# Altium PCB BMS_PCB.PcbDoc (part 1 of 2)
Units mm, origin at the board's own origin, x right, y up, seen from the top; angles counter-clockwise.
Board outline 90.35 x 67.67 mm, 4 copper layers (Top Layer, GND, Layer 3, Bottom Layer), stack 1.579 mm thick; 81 components, 51 nets, 216 pads, 284 vias.
Unrouted connection lines stored in the file: 45.
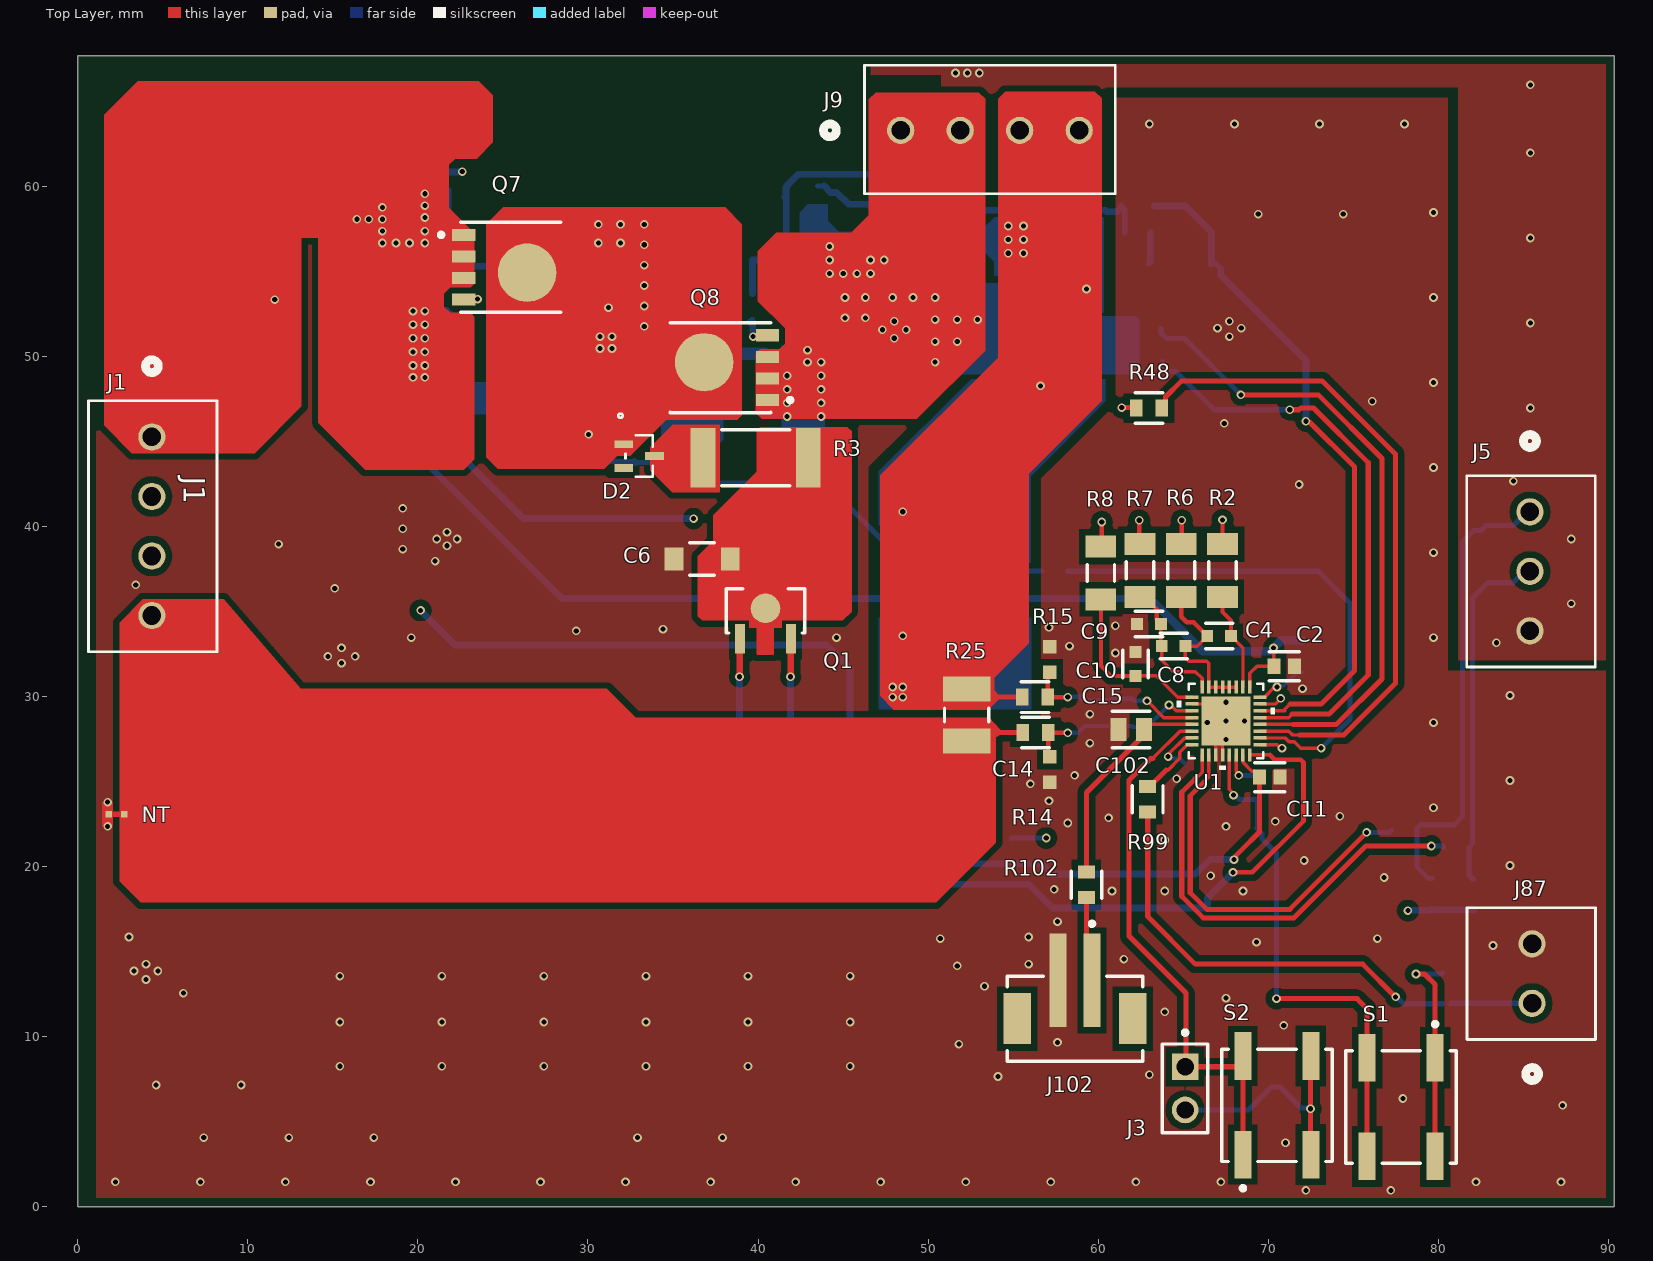
[diagram p0: Top Layer view]
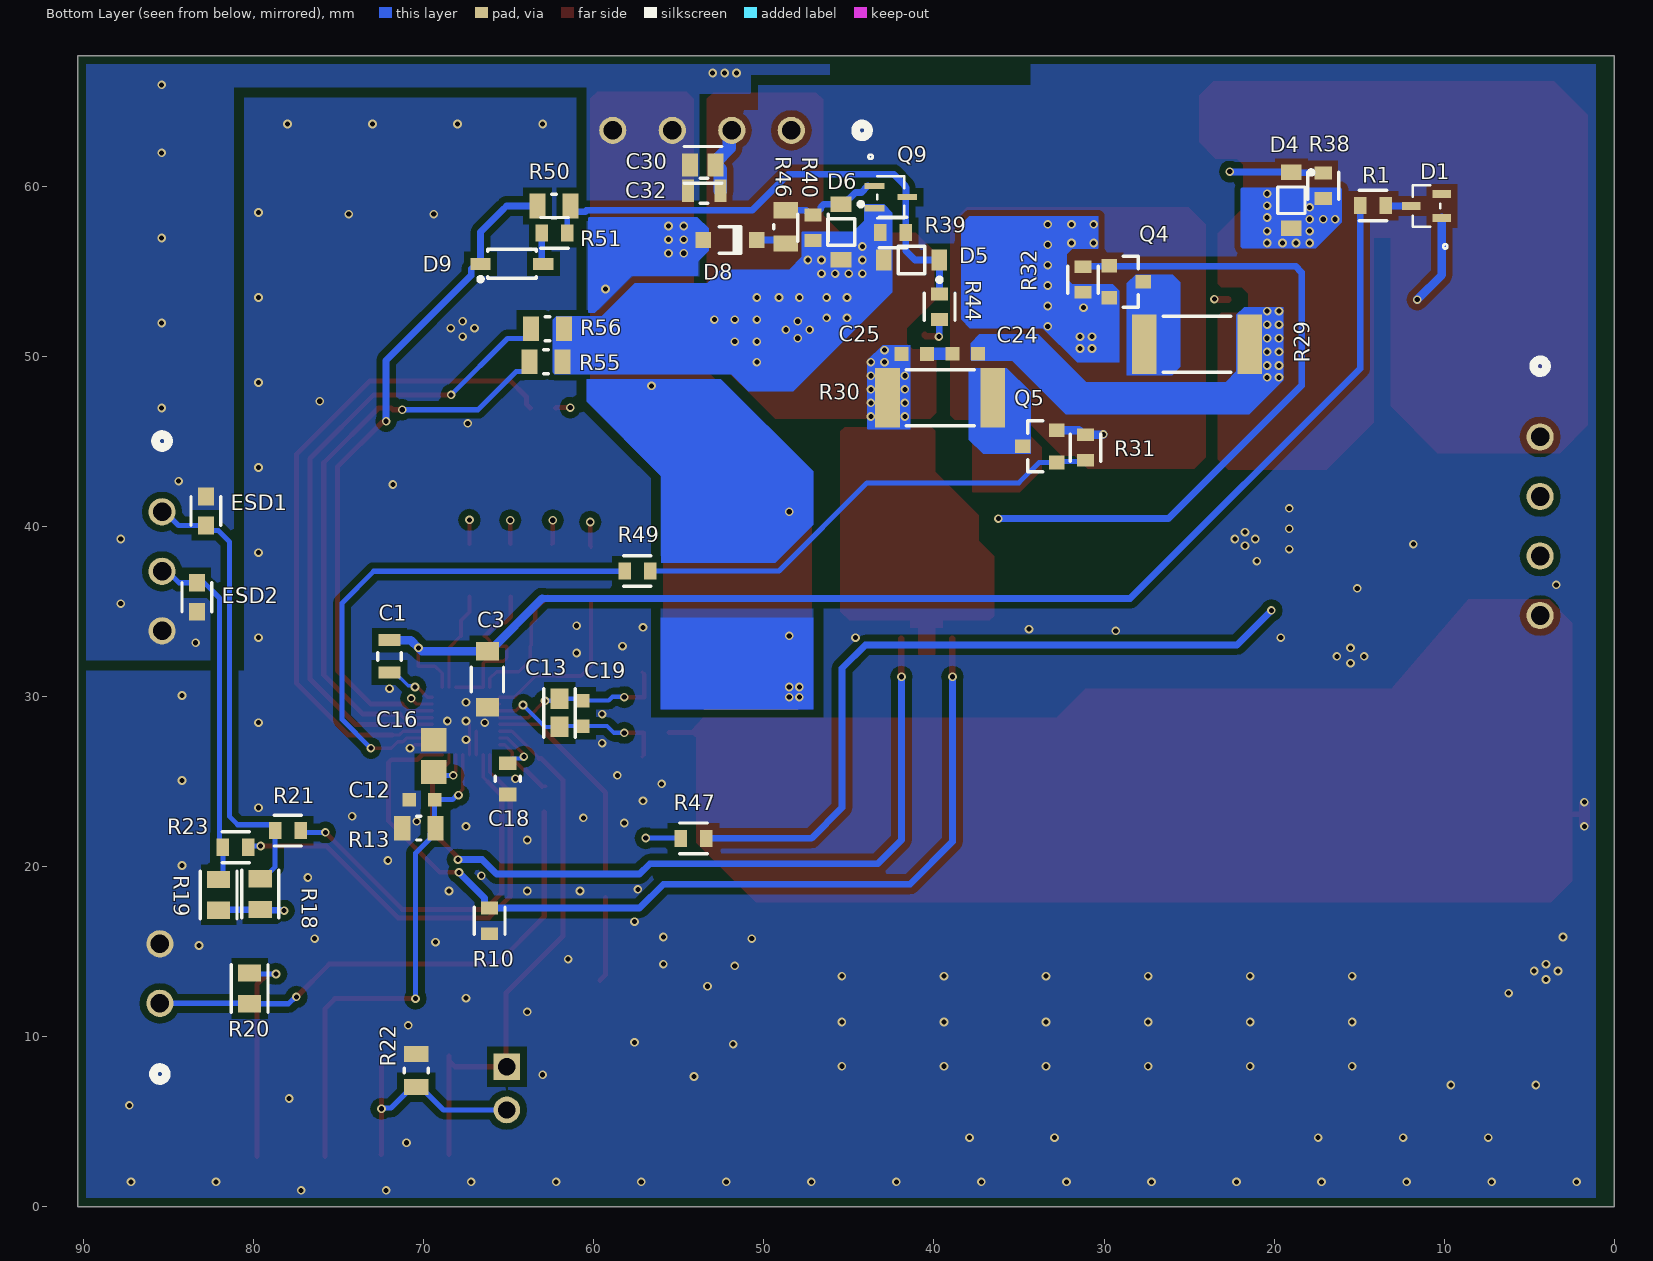
[diagram p1: Bottom Layer view, seen from below]
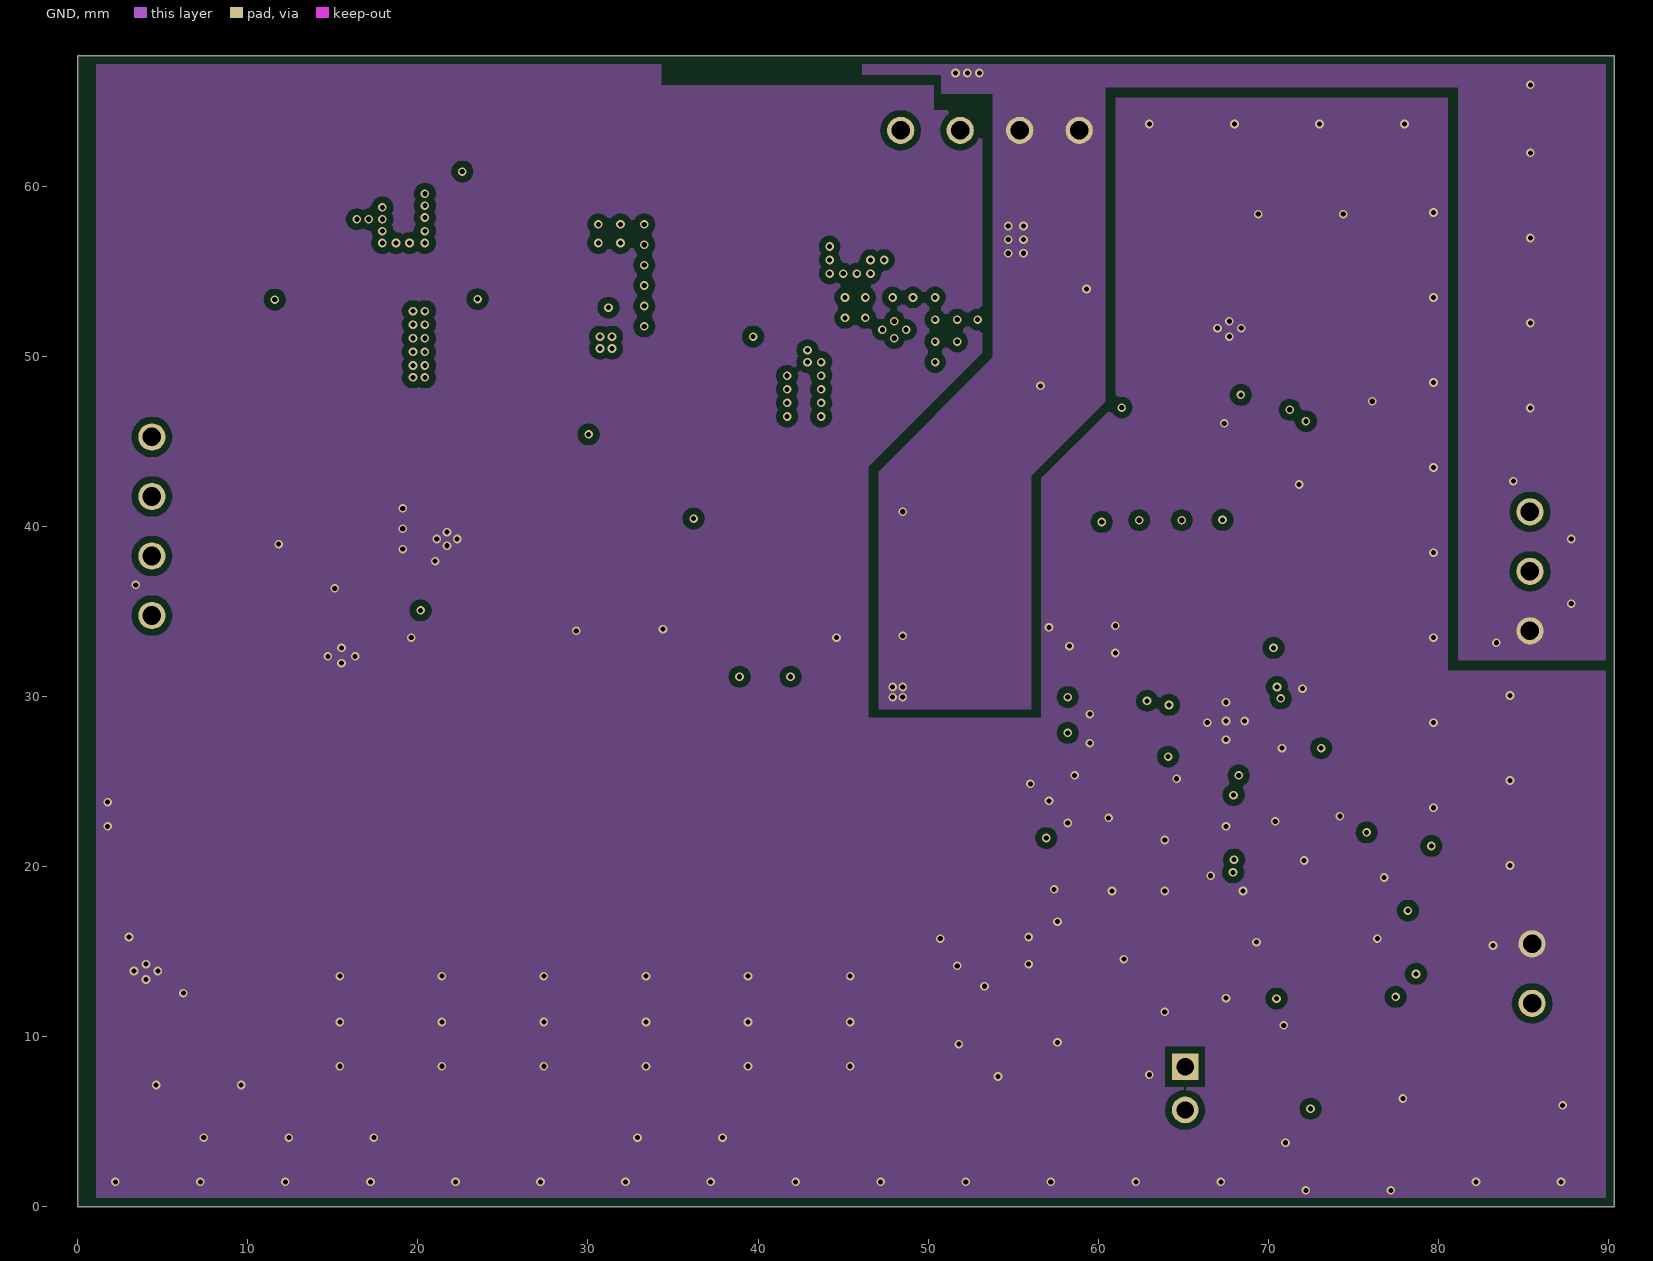
[diagram p2: GND]
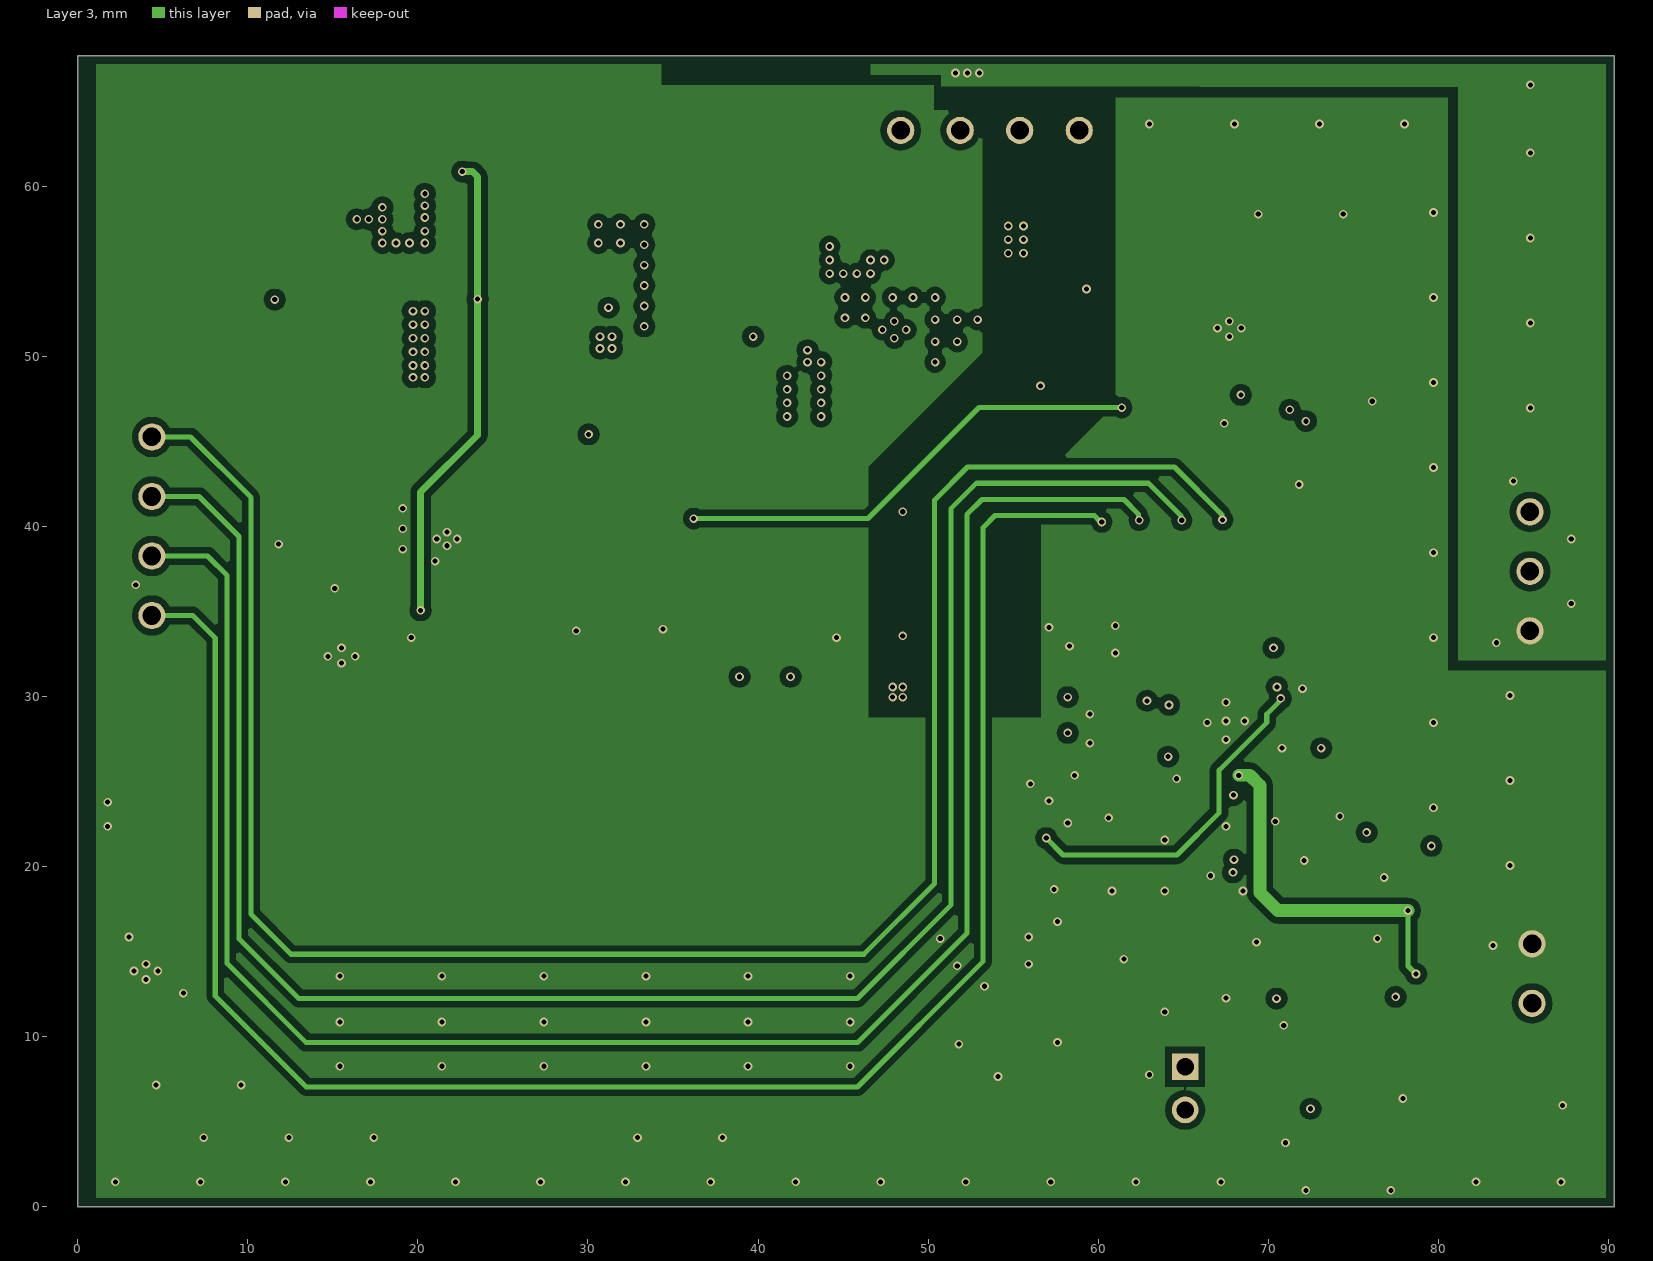
[diagram p3: Layer 3]
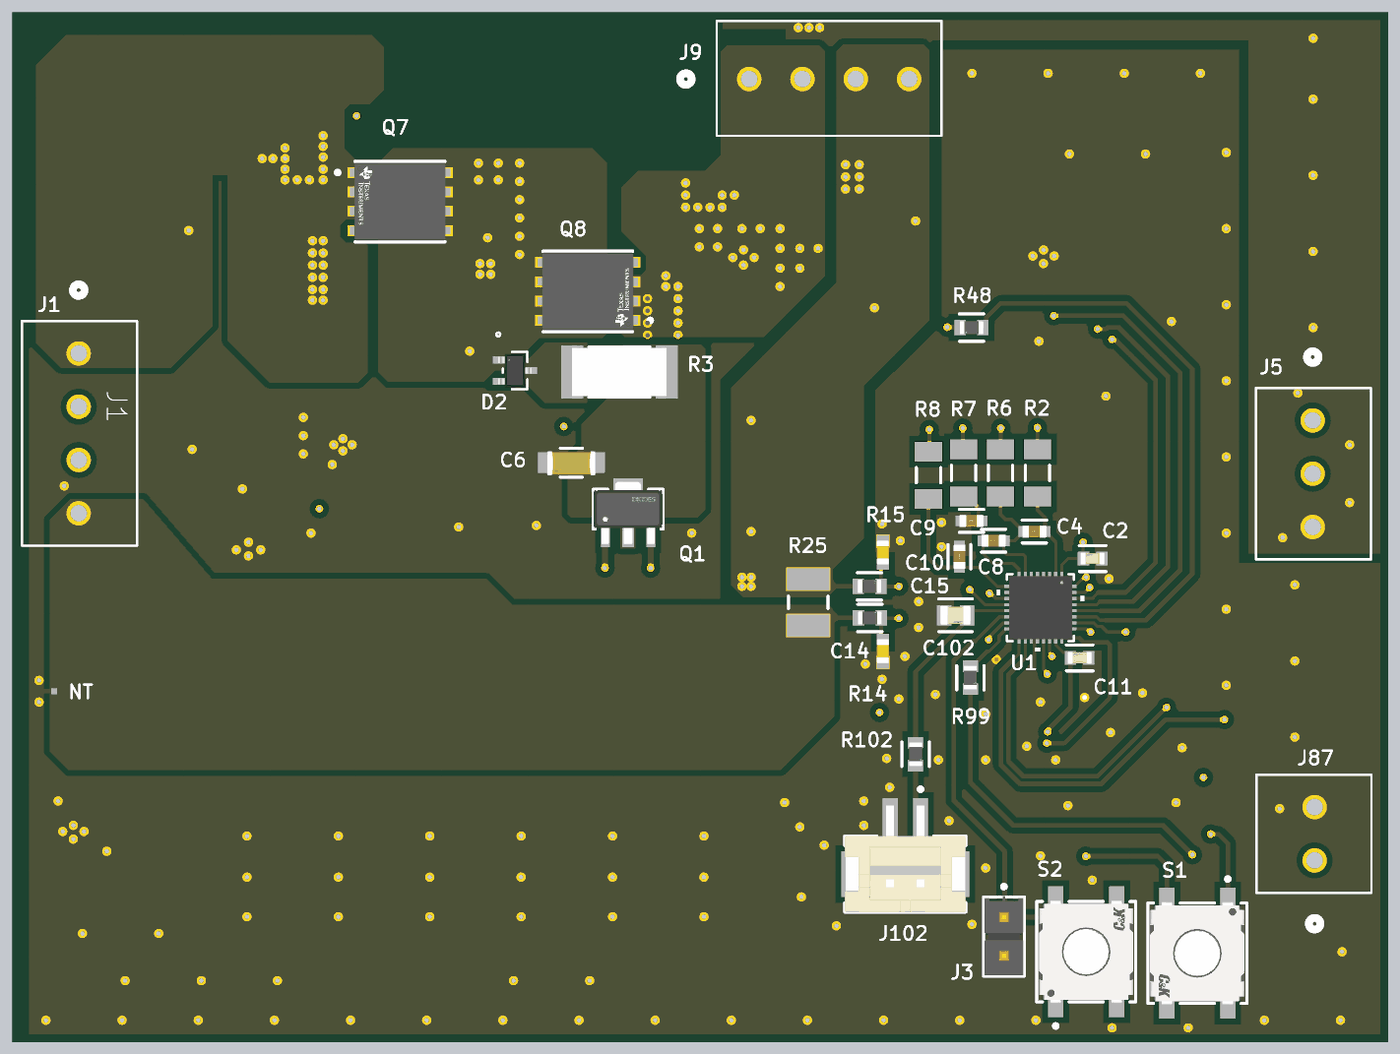
[diagram p5: 3D render of the assembled board from above, using the file's embedded part models]
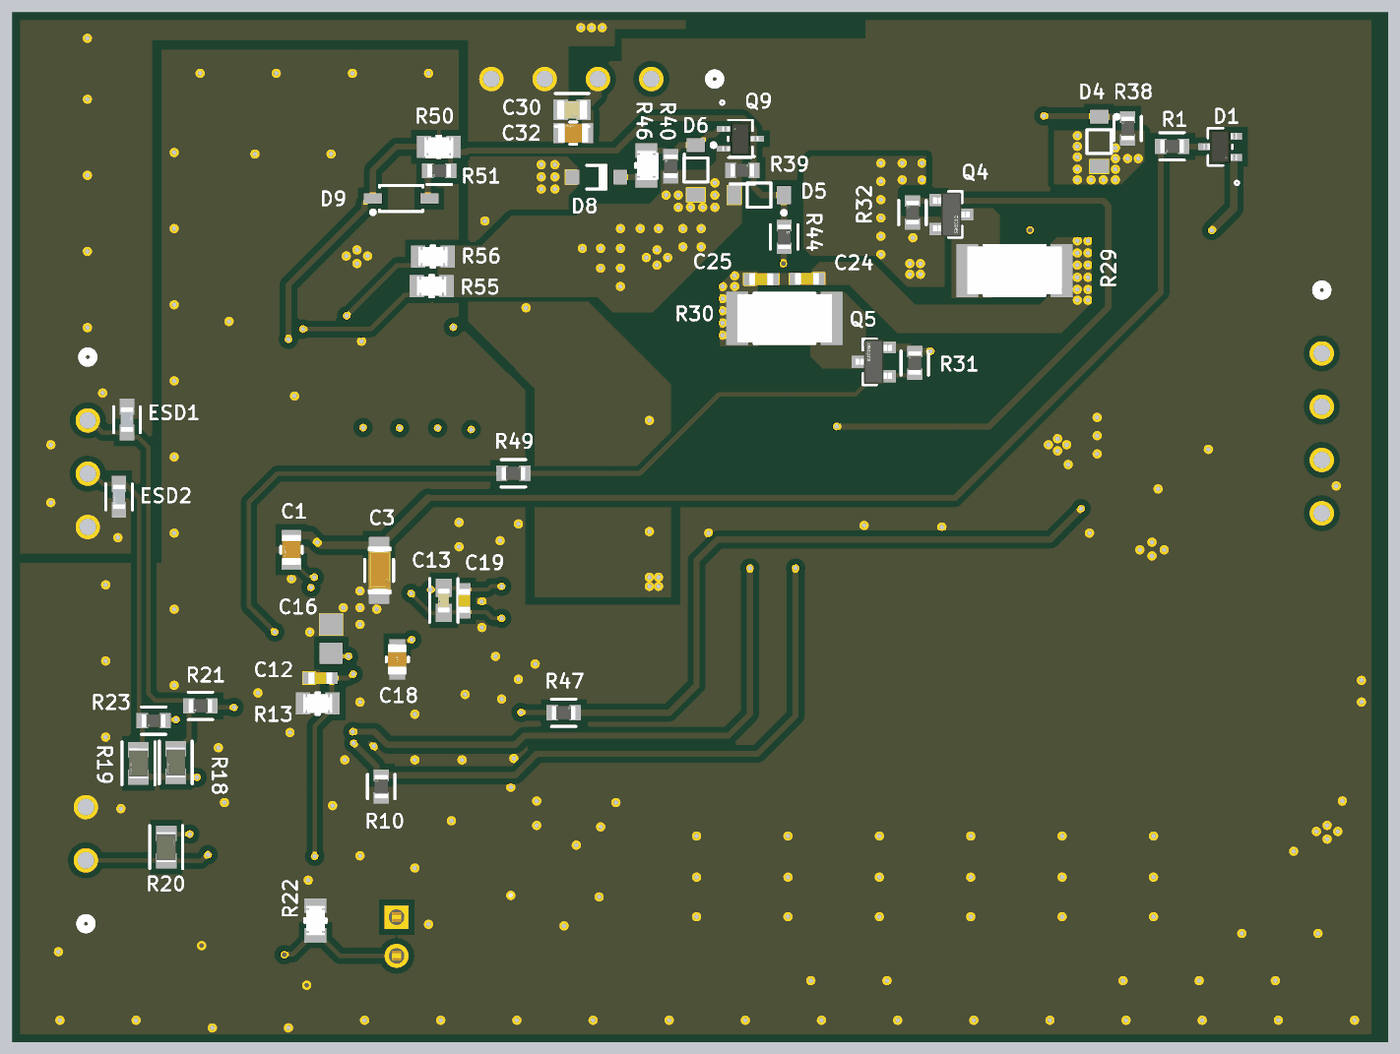
[diagram p6: 3D render of the assembled board from below, using the file's embedded part models]

## Layer stack, top to bottom
Top Solder: solder mask 0.0102, Solder Resist, Dk 3.5
Top Layer: signal copper 0.0356
Dielectric 1: prepreg 0.1524, FR-4 High Tg, Dk 4.2
GND: signal copper 0.0175
Dielectric 2: core 1.1684, FR-4 High Tg, Dk 4.2
Layer 3: signal copper 0.0175
Dielectric 3: prepreg 0.1524, FR-4 High Tg, Dk 4.2
Bottom Layer: signal copper 0.0356
Bottom Solder: solder mask 0.0102, Solder Resist, Dk 3.5

## Board outline
0,0 90.348,0 90.348,67.666 0,67.666

## Design rules (kind name [scope] priority, off if disabled: settings)
AcuteAngle [All] p1: minimum=4.50000000000000E+0001 checktracksonly=FALSE
AssemblyTestPointUsage [All] p1: valid=2
BoardOutlineClearance BoardOutlineClearance_MountingHoles [OnCopper and InComponentClass('Mounting Holes')] p1: gap=1 ignorepadtopadclearanceinfootprint=FALSE
BoardOutlineClearance BoardOutlineClearance_Poly [OnCopper and IsPoly] p2: gap=0.508 ignorepadtopadclearanceinfootprint=FALSE
BoardOutlineClearance [OnCopper and Not InComponentClass('Logo') and not InComponentClass('FiducialMark') and not InRegion(1000,500,4000,800) and not InPoly] p3: gap=0.457 ignorepadtopadclearanceinfootprint=FALSE
Clearance Clearance_U1_Room [(IsTrack Or IsVia) vs IsPad And InComponent('U1')] p1: gap=0.15 ignorepadtopadclearanceinfootprint=FALSE
Clearance Clearance_U1_Internal [IsPad And InComponent('U1') vs IsPad And InComponent('U1')] p2: gap=0.2 ignorepadtopadclearanceinfootprint=TRUE except(0: Arc-Hole Track-Hole SMDPad-Hole THPad-Hole Via-Hole Fill-Hole Poly-Hole Region-Hole Text-Hole)
Clearance Clearance_Keepouts [((IsTrack Or IsArc) And Not InPoly) And IsFree and IsKeepOut vs ((IsTrack Or IsArc) And Not InPoly) And IsFree and IsKeepOut] p3: gap=0 ignorepadtopadclearanceinfootprint=FALSE
Clearance Clearance_Poly [InPolygon] p4: gap=0.381 ignorepadtopadclearanceinfootprint=FALSE except(0: Arc-Hole Track-Hole SMDPad-Hole THPad-Hole Via-Hole Fill-Hole Poly-Hole Region-Hole Text-Hole)
Clearance Clearance_FiducialMark [IsKeepOut and InComponentClass('FiducialMark') vs IsPad and InComponentClass('FiducialMark')] p5: gap=0 ignorepadtopadclearanceinfootprint=FALSE
Clearance [All] p6: gap=0.2 ignorepadtopadclearanceinfootprint=FALSE except(0: Arc-Hole Track-Hole SMDPad-Hole THPad-Hole Via-Hole Fill-Hole Poly-Hole Region-Hole Text-Hole)
ComponentClearance Conn_BodyCollision_Off [InComponent('J9') OR InComponent('J5') OR InComponent('J87') OR InComponent('J1') vs IsComponent] p1: gap=0 collisioncheckmode=3 verticalgap=0 showdistances=FALSE
ComponentClearance "ComponentClearance_TP / Logo" [HasFootprint('IEC_HotSurface_Medium')] p2: gap=0 collisioncheckmode=3 verticalgap=0 showdistances=FALSE // IEC_HotSurface_Medium
ComponentClearance ComponentClearance_Net-tie [HasFootprint('Net-Tie_10mil') or HasFootprint('Net-Tie_50milWide_30milLong') or HasFootprint('Net-Tie_0805_HV_NoOverlay')] p3: gap=0 collisioncheckmode=3 verticalgap=0 showdistances=FALSE
ComponentClearance ComponentClearance_MountingHoles_FiducialMarks [InComponentClass('Mounting Holes') vs InComponentClass('FiducialMark')] p4: gap=0.254 collisioncheckmode=3 verticalgap=0.254 showdistances=FALSE
ComponentClearance ComponentClearance_Shunt [HasFootprint('SNT-100-BK-G')] p5: gap=0 collisioncheckmode=3 verticalgap=0 showdistances=TRUE
ComponentClearance ComponentClearance_Logo [InComponentClass('Logo')] p6: gap=0 collisioncheckmode=3 verticalgap=0 showdistances=FALSE
ComponentClearance ComponentClearance_ScrewToNut [(HasFootprint('NY PMS 440 0025 PH')) vs (HasFootprint('Keystone_1902C'))] p7: gap=0.127 collisioncheckmode=3 verticalgap=0.254 showdistances=FALSE
ComponentClearance ComponentClearance_MountingHoles [InComponentClass('Mounting Holes')] p8: gap=6.35 collisioncheckmode=3 verticalgap=2540 showdistances=FALSE
ComponentClearance ComponentClearance_SmallPassives [HasFootprint('0201*') or HasFootprint('0402*') or HasFootprint('0508') or HasFootprint('0603*') or HasFootprint('0612') or HasFootprint('0805*') or HasFootprint('0815*') or HasFootprint('0830*') or HasFootprint('1206*') or HasFootprint('1210*') or HasFootprint('1808*') or HasFootprint('1812*') or HasFootprint('1825*') or HasFootprint('2010*') or HasFootprint('2220*') or HasFootprint('2225*') or HasFootprint('2512*') or HasFootprint('2728*') or HasFootprint('3518*') vs HasFootprint('0201*') or HasFootprint('0402*') or HasFootprint('0508') or HasFootprint('0603*') or HasFootprint('0612') or HasFootprint('0805*') or HasFootprint('0815*') or HasFootprint('0830*') or HasFootprint('1206*') or HasFootprint('1210*') or HasFootprint('1808*') or HasFootprint('1812*') or HasFootprint('1825*') or HasFootprint('2010*') or HasFootprint('2220*') or HasFootprint('2225*') or HasFootprint('2512*') or HasFootprint('2728*') or HasFootprint('3518*')] p9: gap=0.254 collisioncheckmode=3 verticalgap=0.254 showdistances=FALSE
ComponentClearance ComponentClearance_THtoSMT [IsThruComponent vs IsSMTComponent] p10: gap=0.254 collisioncheckmode=3 verticalgap=0.762 showdistances=FALSE
ComponentClearance ComponentClearance_THtoTH [IsThruComponent vs IsThruComponent] p11: gap=0.254 collisioncheckmode=3 verticalgap=0.762 showdistances=FALSE
ComponentClearance [All] p12: gap=0.254 collisioncheckmode=3 verticalgap=0.254 showdistances=FALSE
DiffPairsRouting [All] p1: maxlimit=2.54 minlimit=0.254 mostfreqgap=0.254 toplayer_minwidth=0.381 toplayer_maxwidth=0.381 toplayer_prefwidth=0.381 midlayer1_minwidth=0.381 midlayer1_maxwidth=0.381 midlayer1_prefwidth=0.381 midlayer2_minwidth=0.381 midlayer2_maxwidth=0.381 midlayer2_prefwidth=0.381 bottomlayer_minwidth=0.381 bottomlayer_maxwidth=0.381 bottomlayer_prefwidth=0.381 maxuncoupledlength=25.4
FabricationTestPointUsage TestPointUsage [All] p1: valid=2 allowmultiple=FALSE
FabricationTestpoint Testpoint [All] p1: side=3 testpointundercomponent=TRUE minsize=1.016 maxsize=2.54 preferedsize=1.524 minholesize=0 maxholesize=1.016 preferedholesize=0.813 testpointgrid=0.025 allowsidetop=TRUE allowsidebottom=TRUE usegrid=TRUE gridtolerance=0
FanoutControl Fanout_LCC [IsLCC] p1: bgadir=Out bgaviamode=Centered fanoutstyle=Auto fanoutdirection=Alternating viagrid=0.025 // Fanout_LCC (Default Rule)
FanoutControl Fanout_BGA [IsBGA] p2: bgadir=Out bgaviamode=Centered fanoutstyle=Auto fanoutdirection=Alternating viagrid=0.025 // Fanout_BGA (Default Rule)
FanoutControl Fanout_Default [All] p4: bgadir=Out bgaviamode=Centered fanoutstyle=Auto fanoutdirection=Alternating viagrid=0.025 // Fanout_Default (Default Rule)
FanoutControl Fanout_Small [(CompPinCount < 5)] p5: bgadir=Out bgaviamode=Centered fanoutstyle=Auto fanoutdirection=OutThenIn viagrid=0.025 // Fanout_Small (Default Rule)
HoleSize [All] p1: absolutevalues=TRUE maxlimit=6.375 minlimit=0.2 maxpercent=80.000 minpercent=20.000
MinimumAnnularRing MinimumAnnularRing_ThermalPadVias [IsVia and InAnyComponent] p1: minimumring=0.15
MinimumAnnularRing [All] p2: minimumring=0.127
MinimumSolderMaskSliver MinimumSolderMaskSliver_Logo [InComponentClass('Logo') vs InComponentClass('Logo')] p1: minsoldermaskwidth=0.018
MinimumSolderMaskSliver [All] p2: minsoldermaskwidth=0.099
PlaneConnect [All] p1: planeconnectstyle=Relief reliefexpansion=0.254 reliefentries=4 reliefconductorwidth=0.254 reliefairgap=0.254
PolygonConnect [All] p1: connectstyle=Direct reliefconductorwidth=0.254 reliefentries=4 polygonreliefangle="90 Angle" airgapwidth=0.254
RoutingVias ThermalPadVias [IsVia and InAnyComponent] p1: holewidth=0.2 width=0.5 viastyle="Through Hole" minholewidth=0.2 minwidth=0.5 maxholewidth=0.33 maxwidth=0.6
RoutingVias [All] p2: holewidth=0.406 width=0.864 viastyle="Through Hole" minholewidth=0.2 minwidth=0.508 maxholewidth=1.016 maxwidth=1.651
SilkToSilkClearance SilkToSilkClearance_Pb-FreeLogo [(HasFootprint('Pb-Free_Overlay_Medium') OR HasFootprint('Pb-Free_Overlay_Small')) vs (HasFootprint('Pb-Free_Overlay_Medium') OR HasFootprint('Pb-Free_Overlay_Small'))] p1: silktosilkclearance=0
SilkToSilkClearance [All] p2: silktosilkclearance=0.099
SilkToSolderMaskClearance SilkToComponentPadClearance [(IsPad or IsFill or IsRegion) and InAnycomponent] p1: minsilkscreentomaskgap=0.127 clearancetoexposedcopper=TRUE
SilkToSolderMaskClearance "Silk to Solder Mask Opening" [All] p2: minsilkscreentomaskgap=0.1 clearancetoexposedcopper=FALSE
SolderMaskExpansion [All] p1: expansion=0.05 istentingtop=FALSE
SupplyNets "Schematic Supply Nets" [InNet('VSS')] p1: voltage=0.000
SupplyNets "Schematic Supply Nets_3" [InNet('REG1')] p2: voltage=0.000
SupplyNets "Schematic Supply Nets_1" [InNet('PGND')] p3: voltage=0.000
Width [All] p1: maxlimit=2.54 minlimit=0.152 preferedwidth=0.254 checkconnectedcopper=TRUE
16 further rules are at their usual default settings.

## Components (designator, comment, footprint, x,y, rotation, side; value= is the part's Value field where it differs from the comment)
C1 "GCM219R71E474KA55D" FP-GCM219-0_15-MFG 72.013,32.35 r270 bottom locked value=470nF
C2 "C0603C101J5GACTU" FP-C0603C-CF-MFG 70.938,31.775 r0 top locked value=100pF
C3 "CGA5L3X7R1H105K160AB" FP-CGA5L-0_3-0_1-MFG 66.263,31 r270 bottom locked value=1µF
C4 "C1608X7R1H224K080AB" FP-C1608-080-0_1-MFG 67.113,33.55 r0 top locked value=220nF
C6 "CGA5L3X7R1H105K160AB" FP-CGA5L-0_3-0_1-MFG 36.713,38.075 r180 top locked value=1µF
C8 "C1608X7R1H224K080AB" FP-C1608-080-0_1-MFG 64.438,32.95 r0 top locked value=220nF
C9 "C1608X7R1H224K080AB" FP-C1608-080-0_1-MFG 62.988,34.25 r0 top locked value=220nF
C10 "C1608X7R1H224K080AB" FP-C1608-080-0_1-MFG 62.188,31.9 r270 top locked value=220nF
C11 "C0603C223K4RACTU" FP-C0603C-CF-MFG 70.088,25.25 r0 top locked value=22nF
C12 "885012206040" WCAP-CSGP_0603_L1.6W0.8H0.8_Reflow 70.113,23.925 r0 bottom locked value=10nF
C13 "C0603C101J5GACTU" FP-C0603C-CF-IPC_A 62.013,29.025 r90 bottom locked value=100pF
C14 "885012206095" WCAP-CSGP_0603_L1.6W0.8H0.8_Reflow 57.163,25.7 r270 top locked value=100nF
C15 "885012206095" WCAP-CSGP_0603_L1.6W0.8H0.8_Reflow 57.163,32.175 r90 top locked value=100nF
C16 "GRM21BR71C105KA01L" CAPC2013X135X45ML10T25 69.413,26.5 r90 bottom locked value=1µF
C18 "C2012X7R1C225K125AB" FP-C2012-125-0_2-MFG 65.063,25.15 r270 bottom locked value=2.2µF
C19 "885012206095" WCAP-CSGP_0603_L1.6W0.8H0.8_Reflow 60.663,29 r90 bottom locked value=100nF
C24 "885012206095" WCAP-CSGP_0603_L1.6W0.8H0.8_Reflow 38.163,50.15 r0 bottom locked value=100nF
C25 "885012206095" WCAP-CSGP_0603_L1.6W0.8H0.8_Reflow 41.163,50.125 r0 bottom locked value=100nF
C30 "C0805C104K5RACTU" FP-C0805C-DN-MFG 53.588,61.25 r0 bottom locked value=100nF
C32 "GRM21BZ71E475KE15L" FP-GRM21B-0_2-e0_2_0_7-MFG 53.513,59.725 r0 bottom locked value=4.7µF
C102 "C0805C222K5RACTU" FP-C0805C-DN-MFG 61.938,28.05 r180 top locked value=2.2nF
D1 "BAS40W-7-F" SOT-323_DIO 11.038,58.825 r90 bottom locked
D2 "BAS40W-7-F" SOT-323_DIO 33.013,44.125 r270 top locked
D4 "MMSZ5246B-7-F" ONSC-SOD-123-2-425-04_V 18.988,59.165 r270 bottom locked
D5 "MMSZ5246B-7-F" ONSC-SOD-123-2-425-04_V 41.313,55.65 r0 bottom locked
D6 "MMSZ5246B-7-F" ONSC-SOD-123-2-425-04_V 45.463,57.3 r270 bottom locked
D8 "1N4148W-7-F" DIOD-SOD123-2_V 51.988,56.825 r180 bottom locked
D9 "BAT46W-E3-18" DIOD-SOD-123-2_V 64.813,55.425 r0 bottom locked
ESD1 "0603ESDA2-TR2" FP-PESD0603-MFG 82.813,40.9 r270 bottom locked
ESD2 "0603ESDA2-TR2" FP-PESD0603-MFG 83.338,35.825 r90 bottom locked
J1 "1820589" CONN_1751264_PXC 4.363,45.25 r270 top locked
J3 "TSW-102-12-T-S" FP-TSW-102-12-T-S-MFG 65.113,6.95 r270 top locked
J5 "1984950" CONN_1751251_PXC 85.388,40.85 r270 top locked
J9 "1820589" CONN_1751264_PXC 48.388,63.275 r0 top locked
J87 "1985807" CONN_1751248_PXC 85.513,11.95 r90 top locked
J102 "B2B-PH-SM4-TB(LF)(SN)" FP-B2B-PH-SM4-TB_LF_SN-MFG 58.638,11.05 r180 top locked
NT "Net-Tie" Net-Tie-Footprint-1 2.286,23.063 r0 top locked net-tie
Q1 "BCX5616H6433XTMA1" FP-SOT89-MFG 40.438,35.025 r0 top locked
Q4 "ZXMP6A13FTA" FP-SOT23-MFG 28.688,54.375 r180 bottom locked
Q5 "ZXMP6A13FTA" FP-SOT23-MFG 33.788,44.7 r0 bottom locked
Q7 "CSD18532Q5B" FP-DNK0008A-MFG 25.463,55.225 r0 top locked
Q8 "CSD18532Q5B" FP-DNK0008A-MFG 37.788,49.325 r180 top locked
Q9 "2N7002KW" SC-70_419AB-01_OSI 42.538,59.35 r270 bottom locked
R1 "CRCW0603100RJNEA" FP-CRCW0603-e3-MFG 14.188,58.85 r0 bottom locked value=100
R2 "CRCW120620R0FKEA" RESC3216X60X45ML10T20 67.313,37.4 r270 top locked value=20
R3 "CRCW2512200RJNEG" FP-CRCW2512-e3-MFG 39.863,44.025 r0 top locked value=200
R6 "CRCW120620R0FKEA" RESC3216X60X45ML10T20 64.888,37.4 r270 top locked value=20
R7 "CRCW120620R0FKEA" RESC3216X60X45ML10T20 62.463,37.4 r270 top locked value=20
R8 "CRCW120620R0FKEA" RESC3216X60X45ML10T20 60.163,37.25 r270 top locked value=20
R10 "CRCW060310M0JNEA" FP-CRCW0603-e3-MFG 66.121,16.796 r90 bottom locked value=10M
R13 "CRCW080510K0FKEA" FP-CRCW0805-e3-MFG 70.288,22.25 r0 bottom locked value=10k
R14 "CRCW0603100RJNEA" FP-CRCW0603-e3-MFG 56.313,27.875 r0 top locked value=100
R15 "CRCW0603100RJNEA" FP-CRCW0603-e3-MFG 56.288,29.95 r0 top locked value=100
R18 "AC0805JR-073K3L" FP-AC0805-IPC_B 79.613,18.375 r270 bottom locked value=3.3k
R19 "AC0805JR-073K3L" FP-AC0805-IPC_B 82.063,18.325 r270 bottom locked value=3.3k
R20 "AC0805JR-073K3L" FP-AC0805-IPC_B 80.238,12.825 r90 bottom locked value=3.3k
R21 "CRCW0603100RJNEA" FP-CRCW0603-e3-MFG 77.988,22.1 r0 bottom locked value=100
R22 "CRCW080510K0FKEA" FP-CRCW0805-e3-MFG 70.438,8 r90 bottom locked value=10k
R23 "CRCW0603100RJNEA" FP-CRCW0603-e3-MFG 81.063,21.125 r0 bottom locked value=100
R25 "PMR25HZPFV1L00" RESC3225X70X50ML20T20 52.263,28.9 r90 top locked
R29 "CRCW25121K00JNEG" FP-CRCW2512-e3-MFG 24.538,50.7 r0 bottom locked value=1k
R30 "CRCW25121K00JNEG" FP-CRCW2512-e3-MFG 39.638,47.55 r0 bottom locked value=1k
R31 "CRCW060310M0JNEA" FP-CRCW0603-e3-MFG 31.088,44.625 r90 bottom locked value=10M
R32 "CRCW060310M0JNEA" FP-CRCW0603-e3-MFG 31.238,54.5 r90 bottom locked value=10M
R38 "CRCW060310M0JNEA" FP-CRCW0603-e3-MFG 17.113,60.025 r90 bottom locked value=10M
R39 "CRCW060310M0JNEA" FP-CRCW0603-e3-MFG 42.413,57.275 r180 bottom locked value=10M
R40 "CRCW060310M0JNEA" FP-CRCW0603-e3-MFG 47.113,57.55 r90 bottom locked value=10M
R44 "CRCW06030000Z0EAHP" FP-CRCW0603-HPe3-MFG 39.663,52.9 r90 bottom locked value=0
R46 "CRCW080510K0FKEA" FP-CRCW0805-e3-MFG 48.713,57.6 r270 bottom locked value=10k
R47 "CRCW06035K10JNEA" FP-CRCW0603-e3-MFG 54.138,21.65 r180 bottom locked value=5.1k
R48 "CRCW06035K10JNEA" FP-CRCW0603-e3-MFG 62.988,46.95 r180 top locked value=5.1k
R49 "CRCW06035K10JNEA" FP-CRCW0603-e3-MFG 57.438,37.375 r180 bottom locked value=5.1k
R50 "CRCW080510K0FKEA" FP-CRCW0805-e3-MFG 62.338,58.825 r0 bottom locked value=10k
R51 "CRCW06031K00JNEA" FP-CRCW0603-e3-MFG 62.313,57.25 r0 bottom locked value=1k
R55 "CRCW080510K0FKEA" FP-CRCW0805-e3-MFG 62.813,49.675 r180 bottom locked value=10k
R56 "CRCW080510K0FKEA" FP-CRCW0805-e3-MFG 62.726,51.612 r180 bottom locked value=10k
R99 "CRCW0603100RJNEA" FP-CRCW0603-e3-MFG 62.913,23.95 r270 top locked value=100
R102 "CRCW0603100RJNEA" FP-CRCW0603-e3-MFG 59.313,18.925 r270 top locked value=100
S1 "KST221JLFS" FP-KSC2_TE_01J_LFS-MFG 77.813,5.85 r270 top locked
S2 "KST221JLFS" FP-KSC2_TE_01J_LFS-MFG 70.513,5.95 r90 top locked
U1 "BQ76922RSNR" QFN32_RSN_TEX 67.513,28.55 r270 top locked

## Footprints (in the part's own frame and the unit in brackets; to place one, negate y for a bottom-side part, rotate by r counter-clockwise, add the part's x,y. Pads: shape width x height; smd on the part's side, far side on the other; paste and mask are expansions set on the pad)
CAPC2013X135X45ML10T25 [mm] "Chip Capacitor, 2-Leads, Body 2.10x1.35mm, IPC Low Density"
  rect 1.4x1.5 smd: 1(-0.95,0) 2(0.95,0)
  body extent -1.05,-0.67 1.05,0.67, height 1.35
CONN_1751248_PXC [mil]
  round 63 hole 43 paste-99999 mask+0: 1(0,0) 2(137.8,0)
  silkscreen extent -179,-147 222,151
CONN_1751251_PXC [mil]
  round 63 hole 43 paste-99999 mask+0: 1(0,0) 2(137.8,0) 3(275.59,0)
  silkscreen extent -179,-147 359,151
CONN_1751264_PXC [mil]
  round 63 hole 43 paste-99999 mask+0: 1(0,0) 2(137.8,0) 3(275.59,0) 4(413.39,0)
  silkscreen extent -179,-147 497,151
DIOD-SOD123-2_V [mm] "SOD123, 2-Leads, Body 2.7x1.55mm, Height 1.45mm"
  rect 0.9x0.95 smd: 1(-1.575,0) 2(1.575,0)
  silkscreen extent -0.64,-0.82 0.64,0.77, body extent -1.35,-0.77 1.35,0.77, height 1.45
DIOD-SOD-123-2_V [mm] "SOD-123, 2-Leads, Body 2.85x1.7mm (max), Pitch 3.7mm"
  rect 1.2x0.7 smd: 1(-1.85,0) 2(1.85,0)
  silkscreen extent -1.43,-0.85 1.97,1.02, body extent -1.42,-0.85 1.43,0.85, height 1.45
FP-AC0805-IPC_B [mm]
  rect 1.008x1.362 smd paste+0 mask+0: 1(-0.902,0) 2(0.902,0)
  silkscreen extent -1.41,-1.08 1.41,1.08, body extent -1,-0.63 1,0.63, height 0.6
FP-B2B-PH-SM4-TB_LF_SN-MFG [mm]
  rect 1x5.5 smd paste+0 mask+0: 1(-1,-2.25) 2(1,-2.25)
  rect 1.6x3 smd paste+0 mask+0: 3(-3.4,0) 4(3.4,0)
  silkscreen extent -3.98,-5.7 3.98,2.5, body extent -4.3,-5.1 4.3,2.6, height 0.25
FP-C0603C-CF-IPC_A [mil]
  rect 47.5x41.66 smd paste+0 mask+0: 1(-32.51,0) 2(32.51,0)
  silkscreen extent -56,-37 56,37, body extent -31,-16 31,16, height 34
FP-C0603C-CF-MFG [mm]
  rect 0.75x0.9 smd paste+0 mask+0: 1(-0.6,0) 2(0.6,0)
  silkscreen extent -0.87,-0.85 0.88,0.85, body extent -1.2,-0.6 1.2,0.6, height 0.25
FP-C0805C-DN-MFG [mm]
  rect 0.95x1.35 smd paste+0 mask+0: 1(-0.75,0) 2(0.75,0)
  silkscreen extent -1.1,-1.07 1.1,1.07, body extent -1,-0.63 1,0.63, height 0.88
FP-C1608-080-0_1-MFG [mm]
  rect 0.7x0.7 smd paste+0 mask+0: 1(-0.7,0) 2(0.7,0)
  silkscreen extent -0.8,-0.75 0.8,0.75, body extent -1.15,-0.55 1.15,0.55, height 0.25
FP-C2012-125-0_2-MFG [mm]
  rect 0.8x1.05 smd paste+0 mask+0: 1(-0.925,0) 2(0.925,0)
  silkscreen extent -0.15,-0.72 0.15,0.72, body extent -1,-0.63 1,0.63, height 1.45
FP-CGA5L-0_3-0_1-MFG [mm]
  rect 1.1x1.35 smd paste+0 mask+0: 1(-1.65,0) 2(1.65,0)
  silkscreen extent -0.72,-0.95 0.72,0.95, body extent -1.6,-0.76 1.6,0.84, height 1.9
FP-CRCW0603-e3-MFG [mm]
  rect 0.75x1 smd paste+0 mask+0: 1(-0.75,0) 2(0.75,0)
  silkscreen extent -0.8,-0.9 0.8,0.9, body extent -0.77,-0.43 0.77,0.43, height 0.5
FP-CRCW0603-HPe3-MFG [mm]
  rect 0.75x1 smd paste+0 mask+0: 1(-0.75,0) 2(0.75,0)
  silkscreen extent -0.8,-0.9 0.8,0.9, body extent -0.8,-0.43 0.8,0.43, height 0.55
FP-CRCW0805-e3-MFG [mm]
  rect 0.95x1.45 smd paste+0 mask+0: 1(-0.975,0) 2(0.975,0)
  silkscreen extent -0.13,-0.7 0.13,0.7, body extent -1,-0.63 1,0.63, height 0.5
FP-CRCW2512-e3-MFG [mm]
  rect 1.45x3.5 smd paste+0 mask+0: 1(-3.1,0) 2(3.1,0)
  silkscreen extent -2,-1.65 2,1.65, body extent -3.93,-1.85 3.93,1.85, height 0.25
FP-DNK0008A-MFG [mm]
  rect 1.372x0.71 smd paste-1000 mask+0: 1(-2.77,1.905) 2(-2.77,0.635) 3(-2.77,-0.635) 4(-2.77,-1.905)
  round 3.434 smd paste-1000 mask+0: 5-6-7-8(0.958,-0.318)
  Top Layer region: -0.984,-2.26 3.456,-2.26 3.456,-1.55 2.866,-1.55 2.866,-0.99 3.456,-0.99 3.456,-0.28 2.866,-0.28 2.866,0.28 3.456,0.28 3.456,0.99 2.866,0.99 2.866,1.55 3.456,1.55 3.456,2.26 -0.984,2.26
  silkscreen extent -4.22,-2.65 2.95,2.65, body extent -3.56,-2.65 3.56,2.65, height 0.25
FP-GCM219-0_15-MFG [mm]
  rect 0.7x1.3 smd paste+0 mask+0: 1(-0.95,0) 2(0.95,0)
  silkscreen extent -0.23,-0.7 0.23,0.7, body extent -1,-0.63 1,0.63, height 0.95
FP-GRM21B-0_2-e0_2_0_7-MFG [mm]
  rect 0.7x1.3 smd paste+0 mask+0: 1(-0.95,0) 2(0.95,0)
  silkscreen extent -0.23,-0.72 0.23,0.72, body extent -1,-0.63 1,0.63, height 1.45
FP-KSC2_TE_01J_LFS-MFG [mm]
  rect 2.8x1 smd paste+0 mask+0: 1(-2.9,2) 2(2.9,2) 3(2.9,-2) 4(-2.9,-2)
  silkscreen extent -5,-3.25 3.3,3.25, body extent -4.4,-3.35 4.4,3.35, height 0.25
FP-PESD0603-MFG [mm]
  rect 1.05x0.95 smd paste+0 mask+0: 1(-0.85,0) 2(0.85,0)
  silkscreen extent -0.85,-0.87 0.85,0.87, body extent -0.8,-0.41 0.8,0.41, height 0.55
FP-SOT23-MFG [mm]
  rect 0.9x0.8 smd paste+0 mask+0: 1(-1,0.95) 2(-1,-0.95) 3(1,0)
  silkscreen extent -0.18,-1.5 0.7,1.5, body extent -1.2,-1.45 1.2,1.45, height 1.1
FP-SOT89-MFG [mm]
  rect 0.58x1.73 smd paste+0 mask+0: 1(-1.5,-1.635) 3(1.5,-1.635)
  round 1.74 smd paste+0 mask+0: 2(0,0.146)
  Top Layer region: -0.38,-2.5 0.38,-2.5 0.38,-1 0.967,-1 0.967,2.03 -0.967,2.03 -0.967,-1 -0.38,-1
  silkscreen extent -2.3,-1.3 2.3,1.3, body extent -2.4,-2.6 2.4,2.13, height 0.25
FP-TSW-102-12-T-S-MFG [mm]
  rect 1.57x1.57 hole 1.02 paste-2539.97 mask+0: 1(-1.27,0)
  round 1.57 hole 1.02 paste-2539.97 mask+0: 2(1.27,0)
  silkscreen extent -3.4,-1.34 2.61,1.34, body extent -2.71,-1.44 2.71,1.44, height 0.25
Net-Tie-Footprint-1 [mm]
  rect 0.4x0.4 smd paste-2539.97 mask-10: 0(-0.457,0)
  rect 0.4x0.4 smd mask-10: 1(0.457,0)
  Top Layer region: -0.305,-0.148 0.295,-0.148 0.295,0.152 -0.305,0.152
ONSC-SOD-123-2-425-04_V [mm] "SOD, 2-Leads, Body 2.69x1.6mm"
  rect 0.91x1.22 smd: 1(-1.635,0) 2(1.635,0)
  silkscreen extent -1.76,-0.8 0.78,1.28, body extent -1.35,-0.8 1.35,0.8, height 1.35
QFN32_RSN_TEX [mil]
  rect 29.81x8.03 smd paste+0 mask+0: 1(-78.41,55.12) 2(-78.41,39.37) 3(-78.41,23.62) 4(-78.41,7.87) 5(-78.41,-7.88) 6(-78.41,-23.63) 7(-78.41,-39.38) 8(-78.41,-55.13) 17(78.41,-55.12) 18(78.41,-39.37) 19(78.41,-23.62) 20(78.41,-7.87) 21(78.41,7.88) 22(78.41,23.63) 23(78.41,39.38) 24(78.41,55.13)
  rect 8.03x29.81 smd paste+0 mask+0: 9(-55.12,-78.41) 10(-39.37,-78.41) 11(-23.62,-78.41) 12(-7.87,-78.41) 13(7.88,-78.41) 14(23.63,-78.41) 15(39.38,-78.41) 16(55.13,-78.41) 25(55.12,78.41) 26(39.37,78.41) 27(23.62,78.41) 28(7.87,78.41) 29(-7.88,78.41) 30(-23.63,78.41) 31(-39.38,78.41) 32(-55.13,78.41)
  rect 114x114 smd paste-57 mask+0: 33(0,0)
  silkscreen extent -87,-113 113,113, body extent -81,-81 81,81, height 32
RESC3216X60X45ML10T20 [mm] "Chip Resistor, 2-Leads, Body 3.20x1.60mm, IPC Low Density"
  rect 1.3x1.8 smd: 1(-1.55,0) 2(1.55,0)
  silkscreen extent -0.5,-0.8 0.5,0.8, body extent -1.65,-0.85 1.65,0.85, height 0.6
RESC3225X70X50ML20T20 [mm] "Chip Resistor, 2-Leads, Body 3.20x2.50mm, IPC Low Density"
  rect 1.45x2.8 smd: 1(-1.525,0) 2(1.525,0)
  silkscreen extent -0.4,-1.3 0.4,1.3, body extent -1.7,-1.35 1.7,1.35, height 0.7
SC-70_419AB-01_OSI [mil]
  rect 14.36x45.56 smd paste+0 mask+0: 1(-25.59,-38) 2(25.59,-38) 3(0,38)
  silkscreen extent -98,-52 49,32, body extent -44,-47 44,47, height 43
SOT-323_DIO [mm]
  rect 0.46x1.1 smd paste+0 mask+0: 1(-0.7,-0.9) 2(0.7,-0.9) 3(0,0.9)
  silkscreen extent -2.5,-1.23 1.23,0.8, body extent -1.1,-1.1 1.1,1.1, height 1
WCAP-CSGP_0603_L1.6W0.8H0.8_Reflow [mm] "Ceramic Capacitors, body 1.6x0.8mm"
  rect 0.8x0.8 smd: 1(-0.75,0) 2(0.75,0)
  body extent -0.8,-0.4 0.8,0.4, height 0.8

## Part data
C1: library part CMP-001-00095-1, "25V 470nF X7R ±10% 0805 Multilayer Ceramic Capacitors MLCC - SMD/SMT ROHS", Case/Package=0805, Max Operating Temperature=125°C, Min Operating Temperature=-55°C, Tolerance=10%, Voltage Rating=25V, Mounting Technology="Surface Mount"
C2 C13: library part CMP-001-00094-1, "Multilayer Ceramic Capacitors MLCC - SMD/SMT 50V 100pF C0G 0603 5%", Case/Package=0603, Max Operating Temperature=125°C, Min Operating Temperature=-55°C, Tolerance=5%, Voltage Rating=50V, Mounting Technology="Surface Mount", Pins=2
C3 C6: library part CMP-001-00096-1, "CGA Series 1206 1 uF 50 V ±10 % Tolerance X7R SMT Multilayer Ceramic Capacitor", Case/Package=1206, Max Operating Temperature=125°C, Min Operating Temperature=-55°C, Tolerance=10%, Voltage Rating=50V, Mounting Technology="Surface Mount"
C4 C8 C9 C10: library part CMP-001-00097-1, "50V 220nF X7R 卤10% 0603 Multilayer Ceramic Capacitors MLCC - SMD/SMT ROHS", Case/Package=0603, Max Operating Temperature=125°C, Min Operating Temperature=-55°C, Tolerance=10%, Voltage Rating=50V, Mounting Technology="Surface Mount", Pins=2
C11: library part CMP-001-00088-1, "Multilayer Ceramic Capacitors MLCC - SMD/SMT 16V 0.022uF X7R 0603 10%", Case/Package=0603, Max Operating Temperature=125°C, Min Operating Temperature=-55°C, Tolerance=10%, Voltage Rating=16V, Mounting Technology="Surface Mount", Pins=2
C12: library part CMP-001-00091-1, "Capacitor 10NF Multilayer Ceramic Mlcc 16 V , X7R Dielectric 0603 Surface Mount", Case/Package=0603, Max Operating Temperature=125°C, Min Operating Temperature=-55°C, Tolerance=10%, Voltage Rating=16V, Mounting Technology="Surface Mount"
C14 C15 C19 C24 C25: library part CMP-001-00099-1, "Ceramic Capacitor, Multilayer, Ceramic, 50V, 10% +Tol, 10% -Tol, X7R, 15% TC, 0.1uF, Surface Mount, 0603", Case/Package=0603, Max Operating Temperature=125°C, Min Operating Temperature=-55°C, Tolerance=10%, Voltage Rating=50V, Mounting Technology="Surface Mount"
C16: library part CMP-001-00090-1, "0805 1 uF 16 V ±10% Tolerance X7R SMT Multilayer Ceramic Capacitor", Case/Package=0805, Max Operating Temperature=125°C, Min Operating Temperature=-55°C, Tolerance=10%, Voltage Rating=16V, Mounting Technology="Surface Mount", Pins=2
C18: library part CMP-001-00092-1, "C Series 0805 2.2 uF 16 V ±10 % Tolerance X7R SMT Multilayer Ceramic Capacitor", Case/Package=0805, Max Operating Temperature=125°C, Min Operating Temperature=-55°C, Tolerance=10%, Voltage Rating=16V, Mounting Technology="Surface Mount", Pins=2
C30: library part CMP-001-00089-1, "50V 100nF X7R ±10% 0805 Multilayer Ceramic Capacitors MLCC - SMD/SMT ROHS", Case/Package=0805, Max Operating Temperature=125°C, Min Operating Temperature=-55°C, Tolerance=10%, Voltage Rating=50V, Mounting Technology="Surface Mount", Pins=2
C32: library part CMP-001-00100-1, "25V 4.7uF X7R ±10% 0805 Multilayer Ceramic Capacitors MLCC - SMD/SMT ROHS", Case/Package=0805, Max Operating Temperature=125°C, Min Operating Temperature=-55°C, Tolerance=10%, Voltage Rating=25V, Mounting Technology="Surface Mount"
C102: library part CMP-001-00087-1, "Multilayer Ceramic Capacitors MLCC - SMD/SMT 50V 2200pF X7R 0805 10%", Case/Package=0805, Max Operating Temperature=125°C, Min Operating Temperature=-55°C, Tolerance=10%, Voltage Rating=50V, Mounting Technology="Surface Mount", Pins=2
D1 D2: "No Description Available", Manufacturer_Name="Diodes Inc", Copyright="Copyright (C) 2026 Ultra Librarian. All rights reserved.", Manufacturer_Part_Number=BAS40W-7-F, RefDes=RefDes, Type=Type
D4 D5 D6: library part CMP-004-00037-1, "Zener Diode Single 16V 5% 17Ohm 500mW 2-Pin SOD-123 T/R / DIODE ZENER 16V 500MW SOD123", Case/Package=SOD-123-2, Forward Voltage=900mV, Max Operating Temperature=150°C, Min Operating Temperature=-55°C, Pins=2
D8: library part CMP-004-00035-1, "Small Signal Diode, Single, 100 V, 300 Ma, 1.25 V, 4 Ns, 2 A Rohs Compliant: Yes", Forward Current=300mA, Forward Voltage=715mV, Max Operating Temperature=150°C, Max Surge Current=2A, Min Operating Temperature=-65°C, Mounting Technology="Surface Mount", Pins=2
D9: library part CMP-004-00033-1, "Rectifier Diode, Schottky, 1 Phase, 1 Element, 0.15A, 100V V(RRM), Silicon", Forward Current=150mA, Forward Voltage=250mV, Max Operating Temperature=150°C, Min Operating Temperature=-55°C, Pins=2
ESD1 ESD2: library part CMP-004-00042-1, "ESD protection diodes / TVS diodes; LITTELFUSE; PESD0603-240; 45 V; 24 V", Case/Package=0603, Max Operating Temperature=125°C, Min Operating Temperature=-55°C, Mounting Technology="Surface Mount"
J1 J9: "PCB terminal block, nominal current: 13.5 A, nom. voltage: 200 V, pitch: 3.5 mm, number of positions: 4, connection method: Screw connection with tension sleeve, mounting: THR soldering, conductor/PCB connection direction: 0 Â°, color: black", Manufacturer_Name="Phoenix Contact", Copyright="Copyright (C) 2026 Ultra Librarian. All rights reserved.", Manufacturer_Part_Number=1820589, RefDes=RefDes, Type=Type
J3: library part CMP-00030-00002-1, "Pin Header, Board-to-Board, 2.54 mm, 1 Rows, 2 Contacts, Through Hole, TSW Series", Current Rating=6.3A, Manufacturer Lifecycle Status=PRODUCTION, Max Operating Temperature=105°C, Min Operating Temperature=-55°C, Voltage Rating=550V, Contact Material="Nickel, Tin", Contact Plating=Tin, Gender=Male, Height=8.71mm, Lead Pitch=2.54mm, Lifecycle Status=Production, Mounting Technology="Through Hole", Number of Contacts=2, Number of Rows=1, Packaging=Bulk, Pitch=2.54mm, Radiation Hardening=No, REACH SVHC=No, RoHS=Compliant, Termination=Solder
J5: "PCB terminal block, nominal current: 13.5 A, rated voltage (III/2): 200 V, nominal cross section: 1.5 mmÂ², number of potentials: 3, Number of rows: 1, Number of positions per row: 3, product range: MKDS 1/..-HT, pitch: 3.5 mm, connection method: Screw con", Manufacturer_Name="Phoenix Contact", Copyright="Copyright (C) 2026 Ultra Librarian. All rights reserved.", Manufacturer_Part_Number=1984950, RefDes=RefDes, Type=Type
J87: "PCB terminal block, nominal current: 13.5 A, nom. voltage: 200 V, pitch: 3.5 mm, number of positions: 2, connection method: Screw connection with tension sleeve, mounting: THR soldering, conductor/PCB connection direction: 0 Â°, color: black. This article can be soldered in the reflow furnace together with SMD components.", Manufacturer_Name="Phoenix Contact", Copyright="Copyright (C) 2026 Ultra Librarian. All rights reserved.", Manufacturer_Part_Number=1985807, RefDes=RefDes, Type=Type
J102: library part CMP-00030-00010-1, "Connector Header, PH Series, 2 Position, 2.00mm, 100V, Surface Mount, Solder, Natural", Max Operating Temperature=85°C, Min Operating Temperature=-25°C, Mounting Technology="Surface Mount", Pins=2
NT: library part CMP-00001-2
Q1: library part CMP-013-00035-1, "Bipolar (BJT) Single Transistor, NPN, 80 V, 1 A, 2 W, SOT-89, Surface Mount", Case/Package=SOT-89, Frequency=150MHz, Max Operating Temperature=150°C, Min Operating Temperature=-65°C, Mounting Technology="Surface Mount", Pins=4
Q4 Q5: library part CMP-004-00036-1, "Trans Mosfet P-ch 60V 1.1A 3-PIN SOT-23 T/r / Mosfet P-ch 60V 0.9A SOT23-3", Case/Package=SOT-23, Max Operating Temperature=150°C, Min Operating Temperature=-55°C, Mounting Technology="Surface Mount", Pins=3
Q7 Q8: library part CMP-031-00010-1, "60-V, N channel NexFET™ power MOSFET, single SON 5 mm x 6 mm, 3.2 mOhm 8-VSON-CLIP -55 to 150", Max Operating Temperature=150°C, Min Operating Temperature=-55°C, Mounting Technology="Surface Mount", Pins=8
Q9: "Description", Manufacturer_Name=onsemi, Copyright="Copyright (C) 2026 Ultra Librarian. All rights reserved.", Manufacturer_Part_Number=2N7002KW
R1 R14 R15 R21 R23 R99 R102: library part CMP-009-00188-1, "100mW Thick Film Resistors 75V ±5% ±200ppm/℃ 100Ω 0603 Chip Resistor - Surface Mount ROHS", Case/Package=0603, Max Operating Temperature=155°C, Min Operating Temperature=-55°C, Tolerance=5%, Voltage Rating=75V, Mounting Technology="Surface Mount", Pins=2
R2 R6 R7 R8: library part CMP-009-00189-1, "Fixed Resistor, Metal Glaze/thick Film, 0.25W, 20ohm, 200V, 1% +/-Tol, Surface Mount, 1206", Case/Package=1206, Max Operating Temperature=155°C, Min Operating Temperature=-55°C, Tolerance=1%, Voltage Rating=200V, Mounting Technology="Surface Mount", Pins=2
R3: library part CMP-009-00185-1, "Fixed Resistor, Metal Glaze/thick Film, 1W, 200ohm, 500V, 5% +/-Tol, Surface Mount, 2512", Case/Package=2512, Max Operating Temperature=155°C, Min Operating Temperature=-55°C, Tolerance=5%, Voltage Rating=500V, Mounting Technology="Surface Mount", Pins=2
R10 R31 R32 R38 R39 R40: library part CMP-009-00184-1, "100mW Thick Film Resistors 75V ±5% ±200ppm/℃ 10MΩ 0603 Chip Resistor - Surface Mount ROHS", Case/Package=0603, Max Operating Temperature=155°C, Min Operating Temperature=-55°C, Tolerance=5%, Voltage Rating=75V, Mounting Technology="Surface Mount", Pins=2
R13 R22 R46 R50 R55 R56: library part CMP-009-00186-1, "Res Thick Film 0805 10K Ohm 1% 0.125W(1/8W) ±100ppm/C Pad SMD Automotive T/R", Case/Package=0805, Max Operating Temperature=155°C, Min Operating Temperature=-55°C, Tolerance=1%, Voltage Rating=150V, Mounting Technology="Surface Mount", Pins=2
R18 R19 R20: library part CMP-009-00178-1, "Res Thick Film 0805 3.3K Ohm 5% 0.125W(1/8W) ±100ppm/C Pad SMD T/R Automotive AEC-Q200", Case/Package=0805, Max Operating Temperature=155°C, Min Operating Temperature=-55°C, Tolerance=5%, Voltage Rating=150V, Mounting Technology="Surface Mount"